# Altium PCB BOARD_2LAYER.PcbDoc (part 4 of 7)
Units mil, origin at the board's own origin, x right, y up, seen from the top; angles counter-clockwise.
Board outline 7677.17 x 7677.17 mil, 2 copper layers (Top Layer, Bottom Layer), stack 34.252 mil thick; 625 components, 375 nets, 1924 pads, 450 vias.
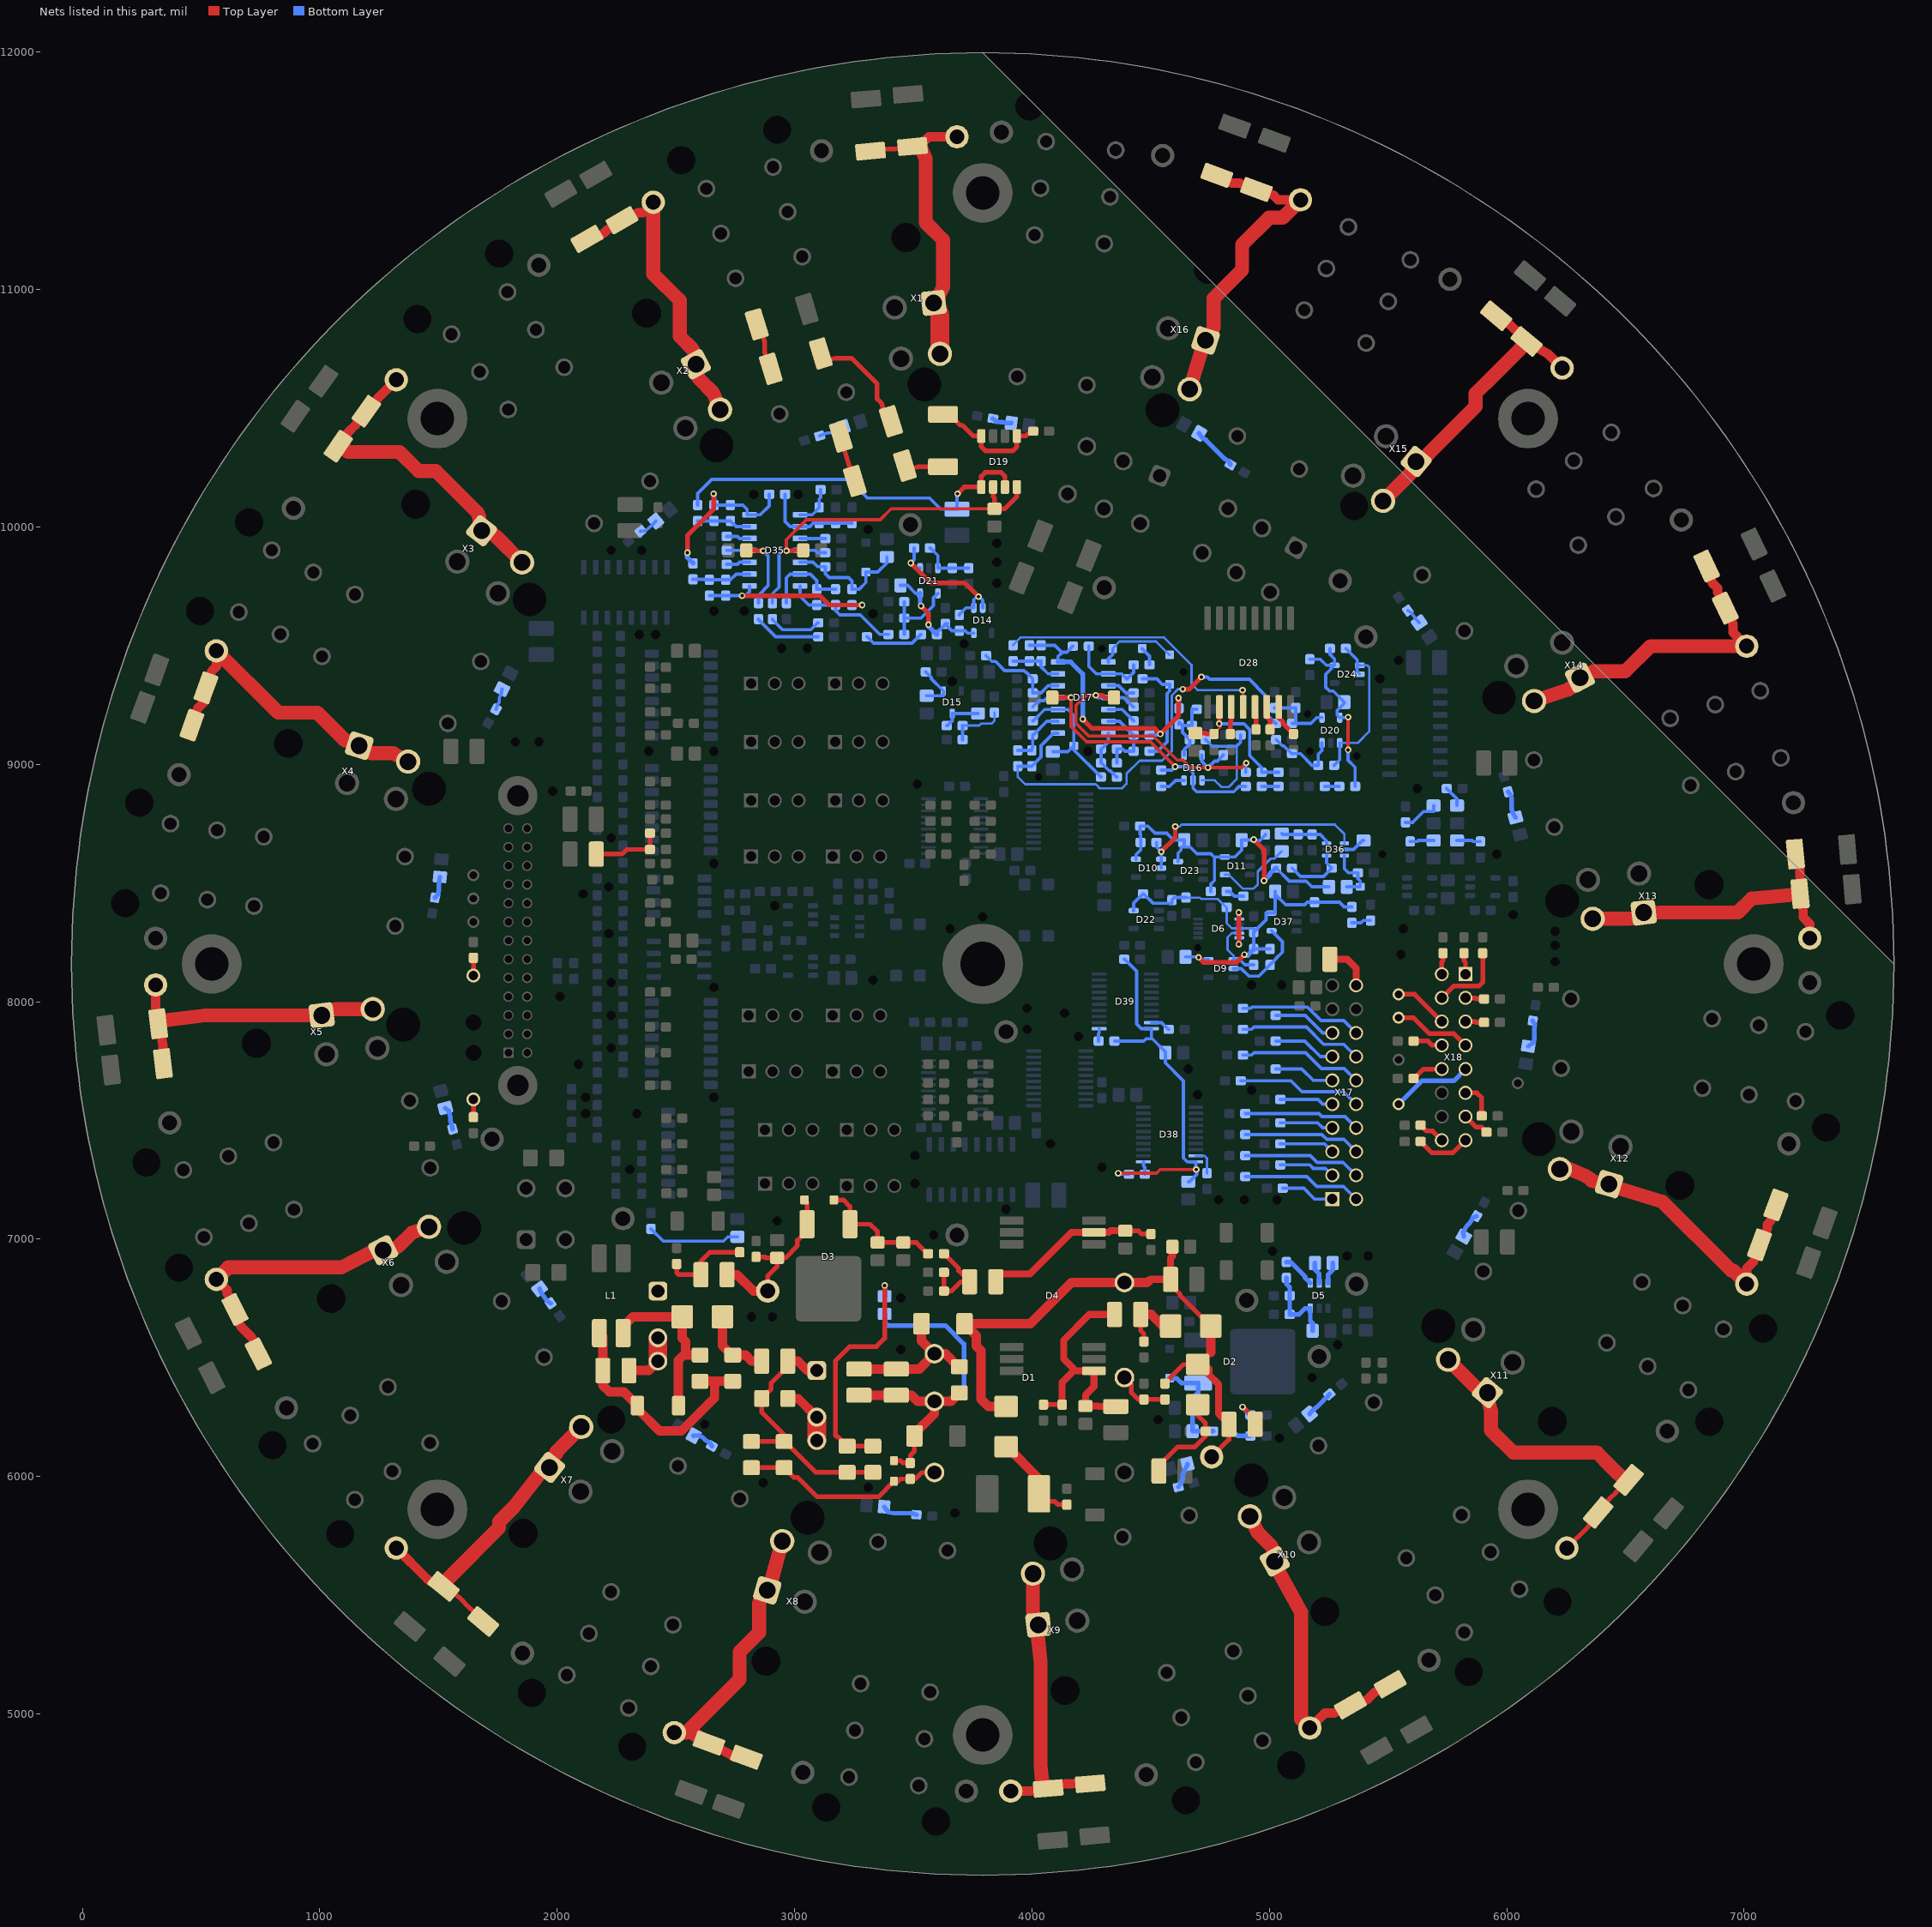
[diagram p4: the nets of this part, all layers, seen from the top]

## Via types
v1: diameter 27.56/27.56 (per signal layer), hole 13.78, Top Layer to Bottom Layer, 447 vias
v2: diameter 78.74, hole 55.12, Top Layer to Bottom Layer, 2 vias
v3: diameter 35.43/35.43 (per signal layer), hole 19.68, Top Layer to Bottom Layer, 1 vias

## Nets (pads, with @x,y where several pads share a name; then routed paths per layer and width w, separated by ;. In a path a pad name is that pad's centre, name@x,y a point inside that pad or via, vN(x,y) a via of type N, cw(c..) or ccw(c..) an arc to the next point about the centre after c; other vN are vias at no path point) (continued)
$2N8271: R1.2 R2.2 TP12.1 X1.1 X1.3 | length 1334.6
  Top Layer w19.68: R2.2@3319.79,11583.1 3372.52,11589.79 3395.77,11591.82 3420.97,11591.82 3444.42,11593.87 R1.2@3496.95,11602.78
  Top Layer w39.37: R1.2@3496.95,11602.78 3552.76,11630.7 3565.77,11643.7 TP12.1@3684.2,11643.7
  Top Layer w59.06: R1.2@3496.95,11602.78 3530.76,11599.85 3552.4,11551.82 3552.4,11282.37 3625.09,11209.69 3625.09,11010.37 3604.56,10968.4 X1.1@3585.74,10944.31
  Top Layer w78.74: X1.1@3585.74,10944.31 3610.06,10900.73 3612.13,10883.85 X1.3@3612.13,10729.39
$2N8326: R3.2 R4.2 TP13.1 X2.1 X2.3 | length 1303.7
  Top Layer w39.37: R3.2@2125.14,11213.59 2182.5,11230.3 2197.23,11238.81 2209.78,11251.36 2224.51,11259.86 R4.2@2272.78,11292.33 2326.06,11316.11 2340.78,11324.62 2361.17,11324.62 TP13.1@2404.67,11368.11
  Top Layer w59.06: TP13.1@2404.67,11368.11 2404.67,11065.87 2516.3,10954.24 2516.3,10802.44 2569.45,10749.3 2577.44,10734.28 X2.1@2584.32,10685.59 2591.2,10636.9 2599.19,10621.89 2657.8,10563.27 X2.3@2685.98,10494.4
$2N8363: R5.2 R6.2 TP14.1 X3.1 X3.3 | length 1374.7
  Top Layer w39.37: R6.2@1077.65,10340.31 1111.74,10387.28 1121.5,10401.21 1149.22,10428.93 1158.97,10442.86 R5.2@1195.76,10487.95 1236.42,10530.33 1246.17,10544.26 TP14.1@1321.99,10620.08
  Top Layer w59.06: R6.2@1077.65,10340.31 1094.15,10340.31 1106.5,10327.97 1118.34,10316.12 1335.49,10316.12 1416.06,10235.55 1489.09,10235.55 1664.16,10060.48 1670.61,10043.7 X3.1@1681.28,9984.17 1729.29,9970.55 1742.69,9960.08 X3.3@1851.91,9850.86
$2N8400: R7.2 R8.2 TP15.1 X4.1 X4.3 | length 1331
  Top Layer w39.37: R8.2@461.01,9165.05 479.74,9219.99 485.56,9235.97 520.07,9270.48 R7.2@520.07,9322.53 538.8,9377.47 544.62,9393.45 564.12,9412.95 TP15.1@564.12,9478.35
  Top Layer w59.06: TP15.1@564.12,9478.35 824.79,9217.67 989.31,9217.67 1106.46,9100.52 1122.64,9095.27 X4.1@1165.83,9078.62 1205.17,9050.12 1215.9,9046.64 1310.17,9046.64 X4.3@1371.77,9011.71
$2N8437: R9.2 R10.2 TP16.1 X5.1 X5.3 | length 1249.1
  Top Layer w39.37: TP16.1@308.21,8070.87 308.21,7981.39 310.28,7964.51 R9.2@319.2,7907.14 329.1,7874.67 338.89,7816.52 340.63,7773.7 R10.2@338.89,7739.81
  Top Layer w59.06: R9.2@319.2,7907.14 348.06,7922.14 517.01,7942.88 943.9,7942.88 960.78,7944.95 X5.1@1007.6,7942.88 1051.19,7967.2 1068.07,7969.27 X5.3@1222.53,7969.27
$2N8474: R11.2 R12.2 TP17.1 X6.1 X6.3 | length 1332.8
  Top Layer w39.37: TP17.1@564.12,6830.71 610.04,6784.79 610.04,6771.19 617.76,6756.04 R11.2@642.65,6703.59 659.69,6647.14 667.41,6631.98 712.93,6586.46 720.65,6571.31 R12.2@741.08,6516.58
  Top Layer w59.06: TP17.1@564.12,6830.71 614.4,6880.99 1091.2,6880.99 1218.76,6945.98 X6.1@1266.73,6953.65 1314.7,6961.31 1329.85,6969.03 1389.12,7028.29 X6.3@1459.66,7051.95
$2N8511: R13.2 R14.2 TP18.1 X7.1 X7.3 | length 1386.6
  Top Layer w19.68: R13.2@1520.8,5537.2 1569.91,5505.45 1584.37,5493.32 1634.4,5443.29 1647.93,5431.94 R14.2@1688.13,5389.56
  Top Layer w39.37: TP18.1@1321.99,5698.82 1450.57,5570.24 1463.6,5559.31 R13.2@1520.8,5537.2
  Top Layer w59.06: R13.2@1520.8,5537.2 1536.46,5563.85 1547.39,5576.87 1755.12,5784.61 1755.12,5809.41 1818.47,5872.75 1926.97,6011.62 X7.1@1967.74,6038.42 1985.33,6083.34 1995.8,6096.74 1995.8,6103.79 X7.3@2101.06,6209.05
$2N8548: R15.2 R16.2 TP19.1 X8.1 X8.3 | length 1282.6
  Top Layer w39.37: R16.2@2639.22,4877.21 2691.06,4849.95 2721.17,4834.01 2719.36,4834.46 2744.65,4818.16 R15.2@2796.7,4818.16
  Top Layer w59.06: TP19.1@2493.25,4921.26 2543.99,4921.26 2553.1,4930.37 ; R16.2@2639.22,4877.21 2609.82,4894.15 2553.1,4930.37 ; X8.3@2947.81,5728.1 2907.35,5580.16 2902.37,5563.9 X8.1@2884.5,5521.03 2854.94,5481.73 2849.97,5465.47 2849.97,5342.54 2768.44,5261.02 2768.44,5145.71 2553.1,4930.37
$2N8585: R17.2 R18.2 TP20.1 X9.1 X9.3 | length 1259.1
  Top Layer w39.37: TP20.1@3910.57,4675.2 3992.31,4675.2 4010.89,4676.82 R18.2@4068.29,4686.59 4124.95,4704.79 4141.89,4706.27 4169.47,4706.27 4187.07,4707.81 R17.2@4245.45,4706.27
  Top Layer w59.06: X9.3@4004.04,5591.16 4004.04,5437.01 4005.82,5420.09 X9.1@4026.67,5375.81 4024.9,5329.15 4036.4,5219.75 4036.4,4782.8 4042.33,4714.91 R18.2@4068.29,4686.59
$2N8594: R19.2 R20.2 TP21.1 X10.1 X10.3 | length 1365.1
  Top Layer w39.37: TP21.1@5170.42,4940.94 5233.6,5004.12 5273.67,5004.12 5288.4,5012.63 R20.2@5341.68,5036.41 5399.04,5053.13 5413.76,5061.63 5442.4,5090.27 5457.13,5098.77 R19.2@5509,5124.99
  Top Layer w59.06: X10.3@4917.66,5832.17 4950.13,5765.22 5008.25,5707.1 5016.5,5692.22 X10.1@5022.64,5642.78 5039.22,5599.12 5133.71,5428.65 5133.71,4977.65 TP21.1@5170.42,4940.94
$2N8603: R21.2 R22.2 TP22.1 X11.1 X11.3 | length 1434
  Top Layer w19.68: TP22.1@6253.09,5698.82 6340.21,5785.94 6352.26,5800.29 R21.2@6385.18,5848.42 6419.08,5889.3 6433.99,5907.07 6459.41,5932.49 6473.92,5949.78 R22.2@6513.14,5986.21
  Top Layer w59.06: X11.3@5752.84,6492.48 5861.66,6383.66 5874.69,6372.73 X11.1@5918.71,6353.29 5921.38,6322.84 5934.09,6276.8 5934.09,6194.09 6027.37,6100.8 6379.82,6100.8 6437.89,6042.73 6467.74,6012.88 6503.02,5983.28 R22.2@6513.14,5986.21
$2N8612: R23.2 R24.2 TP23.1 X12.1 X12.3 | length 1336.1
  Top Layer w39.37: TP23.1@7010.97,6811.02 7010.97,6876.42 7040.31,6905.76 7046.13,6921.74 R23.2@7064.86,6976.68 7092.12,7028.51 7097.93,7044.5 7097.93,7061.81 7109.21,7073.08 7115.03,7089.06 R24.2@7133.76,7144
  Top Layer w59.06: X12.3@6223.81,7295.11 6229.89,7309.62 6330.9,7267.26 6353.33,7252.99 6358.43,7245.85 6364.55,7243.81 X12.1@6430.88,7231.8 6473.75,7213.93 6655.54,7158.35 6947.06,6866.83 6955.16,6866.83 TP23.1@7010.97,6811.02
$2N8621: R25.2 R26.2 TP24.1 X13.1 X13.3 | length 1277.5
  Top Layer w39.37: R25.2@7216.11,8622.28 7234.31,8565.62 7235.8,8548.68 7235.8,8530.94 7237.34,8513.35 R26.2@7235.8,8454.96 7247.01,8397.69 7248.65,8378.98 7248.65,8355.82 7276.72,8327.76 TP24.1@7276.72,8267.72
  Top Layer w59.06: X13.3@6362.4,8349.63 6516.86,8349.63 6533.74,8351.7 X13.1@6577.32,8376.02 6599.76,8370.66 6643.39,8376.02 6973.31,8376.02 7032.47,8435.18 7234.19,8452.83 R26.2@7235.8,8454.96
$2N8630: R27.2 R28.2 TP25.1 X14.1 X14.3 | length 1364.4
  Top Layer w39.37: R28.2@6842.16,9835.3 6859.54,9779.38 6866.73,9763.96 6888.11,9742.58 6888.11,9725.64 6895.3,9710.23 R27.2@6920.9,9658.14 6946.5,9606.04 6953.69,9590.63 6953.69,9555.31 TP25.1@7010.97,9498.03
  Top Layer w59.06: X14.3@6115.42,9266.95 6257.8,9314.69 6261.35,9318.24 6276.5,9325.96 X14.1@6308.36,9365.25 6350.67,9384.02 6365.82,9391.74 6499.44,9391.74 6605.72,9498.03 TP25.1@7010.97,9498.03
$2N8639: R29.2 R30.2 TP26.1 X15.1 X15.3 | length 1285.2
  Top Layer w39.37: R29.2@5955.86,10889.96 6004.97,10858.21 6019.43,10846.08 6030.08,10835.42 6043.61,10824.07 R30.2@6077.53,10788.31 ; R30.2@6083.81,10781.7 6113.19,10764.7 6173.56,10729.14 TP26.1@6233.41,10669.29
  Top Layer w59.06: X15.3@5479.12,10109.98 5531.73,10162.6 5587.94,10218.8 5598.87,10231.83 X15.1@5618.3,10275.86 5646.92,10280.06 5673.86,10312.17 5869.19,10507.51 5869.19,10562.35 5946.23,10639.39 6050.14,10743.3 6079.19,10777.92 R30.2@6083.81,10781.7 6083.81,10782.04 R30.2@6077.53,10788.31
$2N8648: R31.2 R32.2 TP27.1 X16.1 X16.3 | length 1380.9
  Top Layer w39.37: R32.2@4778.38,11481.06 4830.22,11453.8 4846.2,11447.98 4875.31,11447.98 4891.29,11442.17 R31.2@4945.71,11422 5000.64,11403.27 5016.63,11397.45 5036.13,11377.95 TP27.1@5131.05,11377.95
  Top Layer w59.06: X16.3@4664.41,10580.14 4709,10726.85 4714.26,10743.03 X16.1@4731.32,10786.08 4759.82,10825.42 4765.08,10841.6 4765.08,10962.85 4885.05,11082.81 4885.05,11188.97 4998.71,11302.64 5055.73,11302.64 TP27.1@5131.05,11377.95
$2N9630: H5.1 R126.1 | length 109.8
  Bottom Layer w13.78: R126.1@3105.88,10384.08 3121.28,10390.72 3137.5,10395.84 3138.07,10396.4 3157.7,10396.4 3188.9,10406.24 H5.1@3205.61,10421.82
$2N9632: H6.1 R127.1 | length 80.3
  Bottom Layer w13.78: R127.1@2351.56,9982.14 2371.68,9984.14 2388.35,9998.13 2401.73,10009.36 H6.1@2415.39,10025.17
$2N9635: H8.1 R129.1 | length 92.6
  Bottom Layer w19.68: R129.1@1485.28,8438.47 1498.1,8453.16 1501.06,8469.91 1501.06,8487.5 1502.61,8505.3 H8.1@1505.74,8525.73
$2N9637: H9.1 R130.1 | length 97.7
  Bottom Layer w19.68: H9.1@1528.52,7552.46 1542.8,7540.02 1550.56,7511.04 1550.56,7498.23 1556.81,7474.92 R130.1@1559.39,7463.43
$2N9639: H10.1 R131.1 | length 78.5
  Bottom Layer w19.68: H10.1@1925.21,6791 1933.89,6771.71 1944.13,6758.13 1956.89,6739.9 R131.1@1972.09,6730.17
$2N9641: H11.1 R132.1 | length 93.8
  Bottom Layer w19.68: H11.1@2574.85,6172.24 2599.09,6172.95 2613.82,6164.45 2624.46,6153.8 2640.88,6144.32 R132.1@2651.28,6128.94
$2N9643: H12.1 R133.1 | length 148.4
  Bottom Layer w19.68: H12.1@3376.97,5872.72 3395.63,5849.36 3415.2,5845.64 3479.64,5845.64 3496.71,5844.14 R133.1@3513.06,5839.53
$2N9645: H13.1 R134.1 | length 106.3
  Bottom Layer w19.68: R134.1@4616.44,5955.91 4627.74,5973.62 4634.44,5989.58 4634.44,6007.12 4642.8,6024.75 H13.1@4655.36,6052.99
$2N9647: H14.1 R135.1 | length 117.7
  Bottom Layer w19.68: H14.1@5169.54,6264.2 5179.93,6276.25 5197.13,6290.68 5229.41,6322.96 5245.9,6336.8 R135.1@5253.05,6346.6
$2N9649: H15.1 R136.1 | length 109
  Bottom Layer w19.68: H15.1@5819.04,7010.74 5816.84,7030.15 5832.74,7057.69 5847.32,7072.27 5858.36,7091.39 R136.1@5872.19,7097
$2N9651: H16.1 R137.1 | length 121
  Bottom Layer w19.68: H16.1@6090.98,7812.63 6114.24,7830.19 6116.6,7847.03 6116.6,7885.48 6118.22,7901.31 R137.1@6109.49,7919.8
$2N9653: H17.1 R138.1 | length 116.7
  Bottom Layer w19.68: R138.1@6005.85,8885 6016.83,8870.66 6021.23,8854.23 6021.23,8811.1 6025.64,8794.67 H17.1@6036.72,8776.28
$2N9655: H18.1 R139.1 | length 70.5
  Bottom Layer w13.78: R139.1@5583.31,9647.78 5599.11,9638.47 5619.57,9609.25 H18.1@5631.25,9597.57
$2N9657: H19.1 R140.1 | length 188.7
  Bottom Layer w19.68: H19.1@4704.36,10394.68 4717.26,10375.77 4731.99,10367.26 4811.59,10287.66 4826.45,10279.08 R140.1@4836.32,10262.8
$2N9659: H20.1 R141.1 | length 82.8
  Bottom Layer w19.68: R141.1@3835.26,10456.79 3849.95,10443.97 3866.7,10441.01 3873.9,10441.01 3892.18,10438.77 H20.1@3912.82,10437.63
$2N9662: H7.1 R128.1 | length 90.8
  Bottom Layer w13.78: R128.1@1742.27,9231.74 1747.49,9248 1756,9262.72 1756,9280.68 1763.85,9295.77 H7.1@1767.32,9317.22
$3N6860: C67.2 L1.4 V1.2 V12.1 | length 754.9
  Top Layer w39.37: L1.4@2277.5,6604.33 2277.5,6631.89 2318.84,6673.23 V1.2@2526.72,6673.23 2526.72,6582.68 2540.5,6568.9 2540.5,6519.51 ; V12.1@2510.97,6299.21 2510.97,6346.46 2510.52,6346.91 2510.52,6489.53 2540.5,6519.51 ; C67.2@2601.52,6511.81 2540.5,6511.81 2540.5,6519.51
$3N6863: C68.2 L2.1 V1.1 | length 314.3
  Top Layer w39.37: V1.1@2696.01,6673.23 2696.01,6551.18 2735.38,6511.81 C68.2@2739.31,6511.81 2793.45,6511.81 2819.04,6486.22 L2.1@2861.36,6486.22
$3N6864: D1.4 R203.1 R257.2 | length 229.3
  Top Layer w19.68: D1.4@4389.31,6417.32 4417.94,6388.7 4417.94,6354.31 4447.45,6324.8 R257.2@4471.6,6324.8 R203.1@4560.18,6324.8
$3N6865: H1.1 R37.1 R40.1 | length 1005.3
  Top Layer w19.68: R40.1@3329.87,6127.95 R37.1@3221.6,6127.95 3181.27,6168.28 3177.34,6168.28 3172.17,6173.45 3172.17,6488.08 3231.87,6547.78 3344.71,6547.78 3379.08,6582.15 v1(3379.08,6805.12)
  Bottom Layer w19.68: H1.1@3379.08,6759.84 v1(3379.08,6805.12)
$3N6866: D1.6 R38.1 R39.1 R202.2 V5.1 | length 864.7
  Top Layer w19.68: R39.1@2818.05,6037.4 R38.1@2955.85,6037.4 2996.18,5997.08 3012.25,5997.08 3094.7,5914.63 3352.76,5914.63 V5.1@3418.45,5980.31 3436.16,5980.31 3446.01,5990.16 R202.2@3487.35,5990.16 3509.54,5990.16 3536.7,6017.32 D1.6@3589.31,6017.32
$3N6867: C9.2 L8.1 V2.1 | length 412.9
  Top Layer w19.68: L8.1@4029.67,5927.17 4029.67,5895.67 4095.12,5895.67 4108.9,5881.89 C9.2@4146.79,5881.89
  Top Layer w39.37: V2.1@3890.89,6125.98 3894.83,6125.98 4029.67,5991.14 L8.1@4029.67,5927.17
$3N6868: C51.2 C75.1 D2.1 FB2.2 V6.1 | length 427.8
  Bottom Layer w19.68: V6.1@4579.87,6414.37 4609.39,6414.37 4630.06,6393.7 D2.1@4699.94,6393.7 4699.94,6352.68 4676.32,6329.06 C51.2@4676.32,6289.37 C75.1@4676.32,6190.94 FB2.2@4762.94,6190.94
$3N6869: C53.2 C76.1 D3.1 FB3.2 V7.1 | length 560.8
  Top Layer w19.68: V7.1@3165.5,7165.35 3205.85,7165.35 3233.41,7137.8 D3.1@3233.41,7062.99 3318.07,7062.99 3349.55,7031.52 C76.1@3349.55,6986.22 C53.2@3457.82,6986.22 3512.94,6986.22 3560.18,6938.98 FB3.2@3562.15,6938.98
$3N6870: C14.2 C54.2 C98.2 D4.1 L3.2 R86.2 | length 1022.7
  Top Layer w19.68: R86.2@4048.37,6303.15 C14.2@4127.11,6303.15
  Top Layer w29.53: C14.2@4127.11,6303.15 4127.11,6397.05 4175.33,6445.28 ; L3.2@4347.58,6683.07 4242.69,6683.07 4134.07,6574.44 4134.07,6495.72 4175.33,6454.45 4175.33,6445.28 ; C98.2@4353.49,6295.28 4279.67,6295.28 4277.7,6297.24 C54.2@4225.53,6297.24 4225.53,6343.5 4260.97,6378.94 D4.1@4260.97,6445.28 4175.33,6445.28
$3N6871: C12.2 FB3.1 L5.2 R87.2 | length 366.3
  Top Layer w19.68: C12.2@3629.08,6860.24 R87.2@3629.08,6781.5 3661.5,6781.5 3700.87,6820.87 L5.2@3737.35,6820.87 3691.11,6867.1 3691.11,6876.94 FB3.1@3629.08,6938.98
$3N6872: C13.2 C55.2 D4.13 L5.1 | length 767.6
  Top Layer w19.68: C55.2@4392.86,7035.43 4447.82,7035.43 4461.6,7021.65 C13.2@4501.13,7021.65
  Top Layer w29.53: L5.1@3847.58,6820.87 3847.58,6854.11 3991.59,6854.11 4166.22,7028.74 D4.13@4260.97,7028.74 4323.57,7028.74 4330.26,7035.43 C55.2@4392.86,7035.43
$3N6873: D5.4 R84.1 | length 140.3
  Bottom Layer w19.68: R84.1@5071.99,6903.54 5089.37,6903.54 5149.93,6842.98 5149.93,6837.42 D5.4@5172.39,6814.96
$3N6874: C104.2 D5.5 | length 92
  Bottom Layer w19.68: C104.2@5192.07,6899.61 5192.07,6872.05 5209.79,6854.33 D5.5@5209.79,6814.96
$3N6875: C104.1 D5.6 | length 92.8
  Bottom Layer w19.68: D5.6@5247.19,6814.96 5247.19,6850.39 5266.87,6870.08 C104.1@5266.87,6899.61
$3N6877: C18.2 L3.1 V3.1 | length 266.2
  Top Layer w19.68: L3.1@4457.82,6683.07 4457.82,6615.16 4471.6,6601.38 C18.2@4471.6,6568.9
  Top Layer w39.37: L3.1@4457.82,6683.07 4501.91,6683.07 4551.12,6633.86 V3.1@4583.8,6633.86
$3N6880: C25.2 FB6.2 R107.2 | length 303.4
  Top Layer w19.68: R107.2@2164.51,8622.05 2272.78,8622.05 2292.46,8641.73 FB6.2@2390.89,8641.73 C25.2@2390.89,8710.63
$3N6882: C27.2 FB5.1 R104.1 | length 378.9
  Top Layer w19.68: FB5.1@2503.09,6895.67 2503.09,6858.27 2510.97,6850.39 R104.1@2605.46,6850.39 2605.46,6907.41 2642.93,6944.88 C27.2@2768.84,6944.88
$3N6884: C15.2 C52.2 D3.3 R104.2 TP7.1 V7.2 | length 767.2
  Top Layer w19.68: C15.2@2837.74,6925.2 2875.14,6925.2 2879.08,6921.26 C52.2@2926.32,6921.26 ; TP7.1@2886.95,6781.5 2886.95,6845.47 2926.32,6884.84 C52.2@2926.32,6921.26 ; V7.2@3041.48,7165.35 3052.31,7154.53 D3.3@3052.31,7062.99 3052.31,7035.43 3011.98,6995.11 3011.98,6972.25 2960.99,6921.26 C52.2@2926.32,6921.26
  Top Layer w39.37: R104.2@2715.69,6850.39 2758.01,6850.39 2826.91,6781.5 TP7.1@2886.95,6781.5
$3N6886: D6.9 D9.1 R90.1 | length 255.1
  Bottom Layer w9.84: D9.1@4849.55,8177.17 4849.55,8193.77 4824.03,8219.29 4824.03,8271.53 4841.87,8289.37 D6.9@4873.17,8289.37
  Bottom Layer w13.78: D9.1@4849.55,8177.17 4875.16,8177.17 4896.81,8155.51 R90.1@4934.2,8155.51
$3N6887: D6.6 D6.10 | length 190.6
  Top Layer w19.68: v1(4871.2,8242.13) v1(4871.2,8375.98)
  Bottom Layer w9.84: v1(4871.2,8242.13) 4873.17,8244.09 D6.10@4873.17,8269.69 ; v1(4871.2,8375.98) 4873.17,8374.02 D6.6@4873.17,8348.43
$3N6890: C83.1 D15.1 R243.2 | length 202.2
  Bottom Layer w13.78: R243.2@3552.31,9389.76 3575.37,9366.7 3575.37,9360.79 D15.1@3627.11,9309.06 3627.11,9289.37 C83.1@3556.24,9289.37
$3N6891: C58.2 D15.3 R244.1 | length 171
  Bottom Layer w13.78: R244.1@3640.89,9163.39 3643.84,9163.39 3664.51,9184.06 D15.3@3664.51,9214.57 C58.2@3772.78,9214.57
$3N6892: C28.2 FB10.1 R244.2 | length 236
  Bottom Layer w9.84: R244.2@3707.82,9163.39 3777.95,9163.39 3786.47,9171.91 3829.63,9171.91 3841.68,9183.96 C28.2@3841.68,9218.5
  Bottom Layer w13.78: FB10.1@3707.82,9104.33 R244.2@3707.82,9163.39
$3N6921: R171.2 X18.2 | length 90.3
  Top Layer w19.68: X18.2@5726.32,8116.54 5726.32,8167.13 5731.44,8172.24 R171.2@5731.44,8204.72
$3N6924: R172.2 X18.4 | length 322
  Top Layer w19.68: X18.4@5726.32,8016.54 5776.16,8066.37 5882.7,8066.37 5898.76,8082.44 R172.2@5898.76,8204.72
$3N6929: C16.2 C77.1 D5.3 FB4.2 R84.2 | length 355
  Bottom Layer w19.68: R84.2@5071.99,6836.61 5071.99,6811.33 5084.11,6799.21 5084.11,6798.9 5085.77,6797.24 FB4.2@5085.77,6761.81 C16.2@5085.77,6683.07 5125.14,6683.07 5150.73,6708.66 D5.3@5172.39,6708.66 5172.39,6656.48 5182.23,6646.64 C77.1@5182.23,6614.17
$3N6930: C49.2 C64.1 C99.2 D1.3 L4.1 R203.2 TP6.1 V2.2 V3.2 V4.2 | length 2669.8
  Top Layer w9.84: V4.2@4697.98,6472.44 4748.6,6523.07 4752.54,6523.07 4753.09,6523.62
  Top Layer w19.68: R203.2@4560.18,6391.73 4560.18,6393.7 4585.21,6418.74 4585.21,6419.72 4637.94,6472.44 V4.2@4697.98,6472.44 ; C99.2@4583.8,6830.71 4583.8,6809.06 4624.13,6768.73 4624.13,6762.82 V3.2@4753.09,6633.86 ; TP6.1@4757.03,6082.68 4829.87,6155.51 L4.1@4829.87,6220.47
  Top Layer w29.53: 4490.99,6823.52 4498.17,6830.71 C99.2@4583.8,6830.71 4583.8,6920.28 4591.68,6928.15 C49.2@4591.68,6968.5 ; V4.2@4697.98,6472.44 4726.94,6472.44 4745.37,6454.02 4745.37,6428.99 4785.73,6388.63 4785.73,6286.26 4786.06,6285.93 4786.06,6264.28 L4.1@4829.87,6220.47
  Top Layer w39.37: V2.2@3890.89,6295.28 3816.09,6295.28 3785.57,6325.79 3785.57,6530.79 3765.93,6550.44 3765.93,6593.46 C64.1@3715.69,6643.7 3992.67,6643.7 4166.76,6817.79 4321.92,6817.79 4322.39,6817.32 D1.3@4389.31,6817.32 4484.79,6817.32 4490.99,6823.52 ; 4753.09,6523.62 V3.2@4753.09,6633.86
$3N6934: H3.1 R143.1 | length 162.8
  Bottom Layer w13.78: R143.1@5573.96,8755.91 5604.47,8755.91 5604.47,8756.58 5649.2,8801.31 5692.07,8801.31 H3.1@5692.07,8826.77
$3N6936: H4.1 R144.1 | length 393.1
  Bottom Layer w13.78: R144.1@2394.83,7043.31 2446.5,6991.64 2700.44,6991.64 2718.64,7009.84 H4.1@2759,7009.84
$3N6939: H2.2 R142.1 | length 88.8
  Bottom Layer w13.78: R142.1@5747.19,8897.64 5790.5,8854.33 H2.2@5790.5,8826.77
$3N6941: C141.2 D36.5 | length 96.2
  Bottom Layer w13.78: D36.5@5316.09,8641.73 5355.46,8641.73 5392.86,8679.13 C141.2@5396.79,8679.13
$3N6942: C31.2 D36.6 R258.1 V17.1 | length 240.4
  Bottom Layer w13.78: D36.6@5316.09,8616.14 5316.09,8597.44 5315.83,8597.18 5315.83,8560.58 5333.11,8543.31 C31.2@5373.17,8543.31 5373.17,8518.81 5383.01,8508.96 V17.1@5383.01,8484.25 R258.1@5325.93,8484.25
$3N6943: D36.1 R92.1 R185.1 | length 258.4
  Bottom Layer w13.78: R92.1@5095.61,8562.99 5130.54,8528.06 5228.01,8528.07 R185.1@5262.94,8562.99 5241.28,8584.65 D36.1@5241.28,8616.14
$3N6944: D10.1 D10.2 D36.4 R93.1 | length 1019.1
  Top Layer w19.68: v1(4544.43,8631.89) 4603.49,8690.94 v1(4603.49,8738.19)
  Bottom Layer w9.84: v1(4603.49,8738.19) 4622.03,8738.19 4630.54,8746.7 4666.03,8746.7 5275.88,8746.7 5316.09,8706.5 D36.4@5316.09,8667.32
  Bottom Layer w13.78: R93.1@4524.75,8671.26 4524.75,8651.57 v1(4544.43,8631.89) D10.1@4544.43,8600.39 D10.2@4544.43,8562.99
$3N6945: C135.2 D36.3 R145.2 R259.2 | length 211.8
  Bottom Layer w13.78: R259.2@5052.31,8708.66 5056.24,8704.72 C135.2@5121.2,8704.72 R145.2@5180.26,8704.72 5213.57,8704.72 5241.28,8677.01 D36.3@5241.28,8667.32
$3N6946: D9.2 D37.4 R89.1 | length 370.6
  Bottom Layer w13.78: D9.2@4849.55,8139.76 4882.03,8139.76 4914.06,8107.74 4955.14,8107.74 4974.52,8127.12 4974.7,8127.12 R89.1@5003.09,8155.51 5028.13,8180.55 5028.13,8182.51 5054.59,8208.97 5054.59,8253.71 5031.12,8277.17 5031.04,8277.17 D37.4@5009,8299.21
$3N6951: D11.4 R259.1 | length 361.9
  Bottom Layer w9.84: D11.4@4812.15,8535.43 4829.11,8535.43 4888.42,8476.12 4932.85,8476.12 4951.08,8494.34 4951.08,8548.61 5005.38,8602.92 5021.37,8602.92 R259.1@5052.31,8633.86
$3N6960: H21.2 R146.1 | length 100.1
  Bottom Layer w13.78: H21.2@5790.5,8679.13 5854.47,8679.13 5858.41,8675.2 R146.1@5888.92,8675.2
$3N6962: H22.2 R147.1 | length 100.1
  Bottom Layer w13.78: R147.1@5593.64,8675.2 5624.16,8675.2 5628.09,8679.13 H22.2@5692.07,8679.13
$3N6966: C34.2 L6.1 V4.1 | length 416.9
  Top Layer w19.68: L6.1@4534.59,6023.62 4534.59,6045.28 4614.7,6125.38 4686.28,6125.38 4731.44,6170.54 C34.2@4731.44,6190.94 4731.44,6224.53 4697.98,6258 V4.1@4697.98,6303.15
$3N6975: FB11.2 R245.2 | length 79
  Bottom Layer w13.78: R245.2@4820.02,8464.57 4832.69,8464.57 4852.38,8444.88 FB11.2@4890.89,8444.88
$3N6976: C30.2 C59.2 C85.1 D10.5 D11.5 D23.5 R92.2 R93.2 R101.2 R245.1 R258.2 | length 1570.4
  Top Layer w19.68: v1(4934.2,8683.07) 4977.5,8639.76 v1(4977.5,8509.84)
  Bottom Layer w13.78: D10.5@4438.13,8600.39 4438.13,8620.17 4457.82,8639.85 R93.2@4457.82,8671.26 4457.82,8704.72 4455.85,8706.69 C30.2@4455.85,8740.16 4488.33,8740.16 4518.29,8710.2 4566.88,8710.2 4595.98,8681.1 C85.1@4640.89,8681.1 C85.1@4640.89,8651.78 ; D23.5@4615.3,8590.55 4615.3,8626.19 4627.89,8638.78 4627.89,8651.78 C85.1@4640.89,8651.78 ; R245.1@4753.09,8464.57 4753.09,8495.08 4768.67,8510.65 4768.67,8610.24 ; R101.2@4983.41,8704.72 4983.41,8702.76 4958.37,8677.72 4937.58,8677.72 4934.2,8681.1 C59.2@4883.01,8681.1 4883.01,8638.78 4854.47,8610.24 D11.5@4812.15,8610.24 4768.67,8610.24 ; R92.2@5028.68,8562.99 5083.69,8507.98 5155.14,8507.98 5178.87,8484.25 R258.2@5251.13,8484.25 ; C85.1@4640.89,8651.78 4666.27,8651.78 4694.76,8623.29 4753.91,8623.29 4766.97,8610.24 4768.67,8610.24
  Bottom Layer w19.68: v1@4934.2,8681.1 v1(4934.2,8683.07) ; v1(4977.5,8509.84) 5001.68,8534.02 5001.68,8537.96 5026.72,8562.99 R92.2@5028.68,8562.99
$3N6977: FB12.2 R246.2 | length 82.8
  Bottom Layer w13.78: R246.2@5347.58,8332.68 5385.97,8332.68 5395.81,8342.52 FB12.2@5426.32,8342.52
$3N6978: C29.2 C32.2 C60.2 C84.1 D6.8 D9.5 D22.5 D37.5 R89.2 R90.2 R91.2 R94.2 R95.2 R100.2 R246.1 | length 1791.1
  Top Layer w19.68: v1(4701.91,8187.01) 4722.46,8166.46 4862.44,8166.46 4877.4,8181.42 ; 4877.43,8181.42 v1(4894.83,8198.82)
  Bottom Layer w9.84: R94.2@4648.76,8438.98 4706.6,8438.98 4712.88,8432.7 4783.15,8432.7 4818.05,8397.8 R91.2@4820.02,8397.8 4820.02,8330.91 4841.87,8309.06 D6.8@4873.17,8309.06 4934.2,8309.06 C29.2@4934.2,8293.31
  Bottom Layer w13.78: D22.5@4428.29,8383.86 4428.29,8415.35 C32.2@4467.66,8454.72 4469.63,8454.72 4509,8415.35 4589.71,8415.35 R100.2@4589.71,8429.13 4599.55,8438.98 R94.2@4648.76,8438.98 ; C84.1@4646.79,8188.98 4698.96,8188.98 4700.93,8187.01 4710.77,8177.17 D9.5@4743.25,8177.17 ; R89.2@5003.09,8222.44 R90.2@4934.2,8222.44 C29.2@4934.2,8293.31 4986.87,8345.98 4986.87,8374.02 D37.5@5009,8374.02 5024.75,8374.02 C60.2@5024.75,8452.68 ; C60.2@5024.75,8464.57 C60.2@5024.75,8452.68 ; R246.1@5347.58,8399.61 5315.1,8399.61 5295.42,8419.29 R95.2@5190.1,8419.29 5159.59,8419.29 5149.09,8408.79 5068.64,8408.79 C60.2@5024.75,8452.68
  Bottom Layer w19.68: v1@4700.93,8187.01 v1(4701.91,8187.01) ; v1(4894.83,8198.82) 4898.21,8195.44 4909.16,8195.44 4934.2,8220.47 R90.2@4934.2,8222.44
$3N6983: D38.19 R187.2 | length 114.6
  Bottom Layer w9.84: D38.19@4690.1,7351.38 4726.28,7351.38 4737.35,7340.31 R187.2@4737.35,7277.56
$3N6984: D38.1 R98.2 | length 55.8
  Bottom Layer w13.78: D38.1@4469.63,7325.79 4469.63,7308.07 4473.57,7304.13 4475.53,7304.13 R98.2@4475.53,7273.62
$3N6993: D39.19 R188.2 | length 84.7
  Bottom Layer w13.78: D39.19@4503.09,7912.4 4545.42,7912.4 4573.96,7883.86 R188.2@4575.93,7883.86
$3N6994: D39.1 R99.2 | length 53
  Bottom Layer w13.78: R99.2@4280.65,7834.65 4280.65,7866.14 4282.62,7868.11 D39.1@4282.62,7886.81
$3N7053: C62.1 C63.1 D38.20 D39.20 FB7.2 R98.1 R99.1 | length 1670.8
  Top Layer w13.78: v1(4363.33,7277.56) 4524.75,7277.56 4540.5,7293.31 v1(4692.07,7293.31)
  Bottom Layer w13.78: R99.1@4347.58,7834.65 4470.61,7834.65 4480.46,7844.49 4503.09,7844.49 ; v1(4363.33,7277.56) 4367.27,7273.62 R98.1@4408.61,7273.62 ; FB7.2@4388.92,8179.13 4390.89,8179.13 4440.89,8129.13 4440.89,7906.69 4460.77,7886.81 D39.20@4503.09,7886.81 4503.09,7844.49 ; C63.1@4658.61,7242.13 4662.54,7242.13 4693.48,7273.07 4693.48,7291.89 v1(4692.07,7293.31) 4690.1,7295.28 D38.20@4690.1,7325.79 4654.51,7325.79 4638.24,7342.05 4638.24,7666.81 4562.15,7742.9 C62.1@4562.15,7785.43 4562.15,7789.37 4507.03,7844.49 4503.09,7844.49
$3N7060: C67.1 C68.1 L1.3 L7.1 V12.2 | length 1056.1
  Top Layer w39.37: L1.3@2177.5,6604.33 2192.07,6589.76 L7.1@2192.07,6446.85 2192.07,6384.18 2219.91,6356.34 2280.61,6356.34 V12.2@2337.74,6299.21 2337.74,6285.43 2430.72,6192.45 2523.36,6192.45 2662.54,6331.63 2662.54,6385.83 2678.29,6401.57 ; C67.1@2601.52,6401.57 2678.29,6401.57 ; C68.1@2739.31,6401.57 2678.29,6401.57
$3N7061: C65.2 C69.1 C70.1 C71.1 C142.2 C143.2 D1.2 H1.2 L7.2 R36.1 R202.1 V5.2 | length 2058.9
  Top Layer w9.84: R36.1@2971.6,6328.74 R36.1@2974.41,6328.74
  Top Layer w19.68: V5.2@3418.45,6066.93 3446.01,6066.93 3455.85,6057.09 R202.1@3487.35,6057.09 3487.35,6089.57 3505.06,6107.28 C65.2@3505.06,6171.26
  Top Layer w39.37: L7.2@2302.31,6446.85 2384.98,6446.85 C143.2@2424.35,6486.22 ; R36.1@2974.41,6328.74 3014.9,6328.74 v2(3093.64,6250) ; C71.1@3270.81,6342.52 C70.1@3428.29,6342.52 3492.19,6342.52 3517.38,6317.32 D1.2@3589.31,6317.32 ; C65.2@3505.06,6171.26 3505.06,6182.09 3544.86,6221.88 3546.04,6221.88 3589.31,6265.16 D1.2@3589.31,6317.32 ; C69.1@3694.04,6352.36 3659,6317.32 D1.2@3589.31,6317.32
  Top Layer w78.74: C143.2@2424.35,6486.22 v2(2424.35,6584.65) ; C142.2@3093.64,6151.57 v2(3093.64,6250)
  Bottom Layer w19.68: H1.2@3379.08,6685.04 3379.08,6650.57 3393,6636.65 3634.82,6636.65 3713.78,6557.68 3713.78,6364.7 3666.41,6317.32 D1.2@3589.31,6317.32
$3N7062: C64.2 C69.2 C70.2 C71.2 C142.1 C143.1 D1.1 L2.2 R36.2 R37.2 R38.2 R39.2 R40.2 | length 1749
  Top Layer w19.68: R39.2@2818.05,6147.64 R38.2@2955.85,6147.64 ; L2.2@2971.6,6486.22 2971.6,6464.57 2901.69,6394.66 2901.69,6369.07 R36.2@2861.36,6328.74 2861.36,6270.37 2955.85,6175.88 R38.2@2955.85,6147.64 ; R40.2@3329.87,6017.72 R37.2@3221.6,6017.72 3089.71,6017.72 2959.79,6147.64 R38.2@2955.85,6147.64
  Top Layer w39.37: L2.2@2971.6,6486.22 3013.92,6486.22 3053.29,6446.85 C142.1@3093.64,6446.85 ; C71.2@3270.81,6452.76 C70.2@3428.29,6452.76 3524.75,6452.76 D1.1@3589.31,6517.32 ; C64.2@3534.59,6643.7 3534.59,6572.05 D1.1@3589.31,6517.32 ; C69.2@3694.04,6462.6 3690.1,6462.6 3635.38,6517.32 D1.1@3589.31,6517.32
$3N9079: R150.2 X17.1 | length 228
  Bottom Layer w13.78: R150.2@5056.24,7214.57 5144.83,7214.57 5190.5,7168.9 X17.1@5265.3,7168.9
$3N9080: R151.2 X17.3 | length 237.2
  Bottom Layer w13.78: R151.2@5046.4,7312.99 5170.02,7312.99 5185.58,7297.43 5236.76,7297.43 X17.3@5265.3,7268.9
$3N9081: R152.2 X17.5 | length 232.4
  Bottom Layer w13.78: R152.2@5046.4,7401.57 5232.62,7401.57 X17.5@5265.3,7368.9
$3N9082: R153.2 X17.7 | length 227.7
  Bottom Layer w13.78: R153.2@5046.4,7490.16 5203.68,7490.16 5224.94,7468.9 X17.7@5265.3,7468.9
$3N9083: R154.2 X17.9 | length 227.1
  Bottom Layer w13.78: R154.2@5046.4,7588.58 5205.26,7588.58 5224.94,7568.9 X17.9@5265.3,7568.9
$3N9084: R155.2 X17.11 | length 258.3
  Bottom Layer w13.78: R155.2@5026.72,7716.54 5136.89,7716.54 5184.52,7668.9 X17.11@5265.3,7668.9
$3N9085: R156.2 X17.13 | length 265.8
  Bottom Layer w13.78: R156.2@5026.72,7834.65 5148.99,7834.65 5214.74,7768.9 X17.13@5265.3,7768.9
$3N9086: R157.2 X17.15 | length 269.2
  Bottom Layer w13.78: R157.2@5026.72,7942.91 5150.93,7942.91 5224.94,7868.9 X17.15@5265.3,7868.9
$3N9087: R158.2 X17.2 | length 505.8
  Bottom Layer w13.78: R158.2@4898.76,7263.78 5157.87,7263.78 5199.95,7221.7 5312.49,7221.7 X17.2@5365.3,7168.9
$3N9088: R159.2 X17.4 | length 501.1
  Bottom Layer w13.78: R159.2@4898.76,7352.36 5172.22,7352.36 5201.24,7323.34 5310.86,7323.34 X17.4@5365.3,7268.9
$3N9089: R160.2 X17.6 | length 496.4
  Bottom Layer w13.78: R160.2@4898.76,7440.94 5221.28,7440.94 5242.04,7420.18 5314.01,7420.18 X17.6@5365.3,7368.9
$3N9090: R161.2 X17.8 | length 491.6
  Bottom Layer w13.78: R161.2@4898.76,7529.53 4931.24,7529.53 4945.16,7529.53 5208.23,7529.53 5221.82,7515.94 5318.26,7515.94 X17.8@5365.3,7468.9
$3N9091: R162.2 X17.10 | length 527
  Bottom Layer w13.78: R162.2@4879.08,7667.32 5091.71,7667.32 5137.36,7621.67 5312.52,7621.67 X17.10@5365.3,7568.9
$3N9092: R163.2 X17.12 | length 528.7
  Bottom Layer w13.78: R163.2@4888.92,7775.59 4925.48,7775.59 4935.32,7785.43 5152.32,7785.43 5219,7718.76 5315.44,7718.76 X17.12@5365.3,7668.9
$3N9093: R164.2 X17.14 | length 532.2
  Bottom Layer w13.78: R164.2@4888.92,7883.86 4925.48,7883.86 4935.32,7893.7 5155.88,7893.7 5228.86,7820.72 5313.48,7820.72 X17.14@5365.3,7768.9
$3N9094: R165.2 X17.16 | length 523.9
  Bottom Layer w13.78: R165.2@4888.92,7972.44 4921.4,7972.44 4926.99,7978.03 5159.73,7978.03 5217.25,7920.5 5313.69,7920.5 X17.16@5365.3,7868.9
$3N9104: R106.2 X17.20 | length 198.6
  Top Layer w29.53: R106.2@5255.06,8179.13 5327.88,8179.13 5365.3,8141.72 X17.20@5365.3,8068.9
$3N9149: C10.2 FB2.1 L4.2 R88.2 | length 331.8
  Top Layer w19.68: v1(4886.95,6293.31) 4888.92,6293.31 4940.1,6242.13 L4.2@4940.1,6220.47
  Bottom Layer w19.68: FB2.1@4829.87,6190.94 4847.58,6190.94 4867.27,6171.26 R88.2@4920.42,6171.26 C10.2@4920.42,6259.84 4918.45,6259.84 4886.95,6291.34 v1(4886.95,6293.31)
$3N9198: R167.2 X18.15 | length 230.6
  Top Layer w19.68: R167.2@5636.95,7411.42 5684.2,7364.17 5773.96,7364.17 X18.15@5826.32,7416.54
$3N9199: R166.2 X18.16 | length 115.8
  Top Layer w19.68: R166.2@5636.95,7480.31 5661.99,7455.28 5687.58,7455.28 X18.16@5726.32,7416.54
$3N9201: R170.2 X18.1 | length 90.8
  Top Layer w19.68: R170.2@5820.02,8204.72 5820.02,8172.24 5826.32,8165.94 X18.1@5826.32,8116.54
$3N9228: R149.2 X18.5 | length 79.7
  Top Layer w19.68: X18.5@5826.32,7916.54 5867.86,7916.54 5871.01,7913.39 R149.2@5904.67,7913.39
$3N9229: R148.1 X18.3 | length 80.3
  Top Layer w19.68: X18.3@5826.32,8016.54 5867.07,8016.54 5871.79,8011.81 R148.1@5904.67,8011.81
$3N9241: R189.2 X18.10 | length 135.2
  Top Layer w19.68: R189.2@5607.42,7677.17 5609.39,7677.17 5648.76,7716.54 X18.10@5726.32,7716.54
$3N9243: R168.2 X18.8 | length 126.5
  Top Layer w19.68: R168.2@5607.42,7834.65 5639.9,7834.65 5640.03,7834.77 5667.74,7834.77 5685.97,7816.54 X18.8@5726.32,7816.54
$3N9245: R169.2 X18.11 | length 152.8
  Top Layer w19.68: X18.11@5826.32,7616.54 5873.43,7616.54 5894.83,7595.14 R169.2@5894.83,7519.69
$3N9255: R190.2 X18.13 | length 115.4
  Top Layer w19.68: X18.13@5826.32,7516.54 5870.97,7471.88 5893.41,7471.88 R190.2@5914.51,7450.79
$3N9275: KW6.1 X18.6 | length 229.6
  Top Layer w19.68: KW6.1@5544.43,8031.5 5611.52,8031.5 5694.31,7948.71 5694.31,7948.55 X18.6@5726.32,7916.54
$3N9277: KW4.1 X18.7 | length 330.2
  Top Layer w19.68: KW4.1@5544.43,7933.07 5606.66,7933.07 5673.23,7866.51 5776.35,7866.51 X18.7@5826.32,7816.54
$3N9279: KW5.1 X18.9 | length 343
  Bottom Layer w19.68: KW5.1@5544.43,7568.9 5642.55,7667.01 5776.8,7667.01 X18.9@5826.32,7716.54
$3N9315: KW9.1 R191.2 | length 74.8
  Top Layer w19.68: R191.2@1646.79,7513.78 KW9.1@1646.79,7588.58
$3N9319: KW10.1 R192.2 | length 74.8
  Top Layer w19.68: KW10.1@1646.79,8110.24 R192.2@1646.79,8185.04
$4N1524: C136.1 D28.13 | length 96.4
  Top Layer w19.68: D28.13@4939.51,9242.13 4939.51,9206.82 4944.04,9202.29 C136.1@4944.04,9147.64
$4N1528: D17.2 R208.1 R209.2 R210.2 | length 338.7
  Bottom Layer w13.78: R208.1@4239.31,9498.03 4239.31,9413.06 4270.88,9381.5 D17.2@4321.99,9381.5 4377.5,9381.5 R210.2@4398.76,9360.24 4400.73,9360.24 4428.29,9387.8 R209.2@4428.29,9419.29
$4N1529: D17.3 R193.1 | length 118.9
  Bottom Layer w13.78: D17.3@4321.99,9331.5 4365.5,9331.5 4395.81,9301.18 R193.1@4428.29,9301.18
$4N1530: D17.5 R194.1 | length 126.4
  Bottom Layer w13.78: D17.5@4321.99,9231.5 4379.87,9231.5 R194.1@4428.29,9183.07
$4N1531: D17.1 V8.2 V9.1 | length 339.7
  Bottom Layer w9.84: V8.2@4340.69,9488.19 4340.69,9489.17 4369.24,9517.72 4522.78,9517.72 4578.88,9461.61 V9.1@4579.87,9461.61
  Bottom Layer w13.78: D17.1@4321.99,9431.5 4321.99,9445.07 4340.69,9463.77 V8.2@4340.69,9488.19
$4N1532: R209.1 V8.1 | length 81.5
  Bottom Layer w13.78: V8.1@4464.71,9488.19 4464.71,9487.2 4495.22,9456.69 R209.1@4495.22,9419.29
$4N1533: C111.1 D17.6 R211.1 R227.1 R228.2 | length 333
  Bottom Layer w13.78: D17.6@4321.99,9181.5 4368.84,9181.5 4426.32,9124.02 R227.1@4428.29,9124.02 R211.1@4428.29,9055.12 4391.87,9055.12 4382.03,9064.96 C111.1@4357.42,9064.96 R228.2@4357.42,9005.91
$4N1534: R210.1 R211.2 V9.2 | length 461.3
  Bottom Layer w13.78: R210.1@4465.69,9360.24 4525.73,9360.24 4548.37,9337.6 V9.2@4579.87,9337.6 4579.87,9309.06 4569.27,9298.46 4569.27,9094.68 4529.71,9055.12 R211.2@4495.22,9055.12
$4N1535: C107.1 D17.13 R207.1 R232.2 | length 225.2
  Bottom Layer w13.78: R207.1@3920.42,9435.04 C107.1@3989.31,9435.04 R232.2@4038.53,9435.04 4038.53,9411.02 4068.05,9381.5 D17.13@4109.39,9381.5
$4N1536: D16.3 R195.1 | length 107.1
  Bottom Layer w13.78: R195.1@4544.43,8907.48 4579.3,8907.48 4604.89,8933.07 D16.3@4640.89,8933.07
$4N1537: C109.2 D16.1 R173.2 | length 507.9
  Bottom Layer w9.84: D16.1@4715.69,8933.07 4769.48,8933.07 4798.02,8904.53 4829.01,8904.53 4862.29,8937.8 4862.29,9076.24
  Bottom Layer w13.78: C109.2@4731.44,9104.33 4759.54,9076.24 4862.29,9076.24 4862.29,9076.71 4879.08,9093.5 R173.2@4879.08,9124.02
$4N1538: C111.2 D17.7 R219.2 R228.1 | length 231.2
  Bottom Layer w13.78: D17.7@4321.99,9131.5 4321.99,9094.49 4292.46,9064.96 C111.2@4290.5,9064.96 R228.1@4290.5,9005.91 4292.46,9005.91 4326.48,8971.88 4330.42,8971.88 4355.46,8946.85 R219.2@4357.42,8946.85
$4N1539: C105.1 D17.9 R212.2 R255.2 | length 255.8
  Bottom Layer w13.78: C105.1@3940.1,9059.06 R255.2@3999.16,9059.06 3999.16,9067.44 4003.09,9071.38 R212.2@4003.09,9124.02 4005.06,9124.02 4062.54,9181.5 D17.9@4109.39,9181.5
$4N1540: C107.2 D17.14 R208.2 R227.2 R230.2 R232.1 | length 1195.9
  Top Layer w19.68: v1(4213.72,9190.94) 4253.09,9151.57 4516.87,9151.57 v1(4540.5,9127.95) 4617.27,9204.72 v1(4617.27,9279.53)
  Bottom Layer w13.78: C107.2@3989.31,9501.97 R232.1@4038.53,9501.97 4095.67,9501.97 4124.64,9473 ; D17.14@4109.39,9431.5 4109.39,9454.13 4124.64,9469.38 4124.64,9473 ; R208.2@4172.39,9498.03 4147.35,9473 4124.64,9473 ; R227.2@4495.22,9124.02 4536.56,9124.02 v1(4540.5,9127.95)
  Bottom Layer w19.68: D17.14@4109.39,9431.5 4163.3,9431.5 4213.72,9381.07 v1(4213.72,9190.94) ; v1(4617.27,9279.53) 4619.24,9277.56 R230.2@4619.24,9236.22
$4N1541: C108.2 D17.12 R204.2 R233.2 | length 415.5
  Bottom Layer w13.78: R204.2@3806.24,9458.66 3831.28,9433.63 3846.04,9433.63 3884.9,9394.77 3966.59,9394.77 3976.09,9385.27 3978.06,9385.27 R233.2@4003.09,9360.24 C108.2@4003.09,9301.18 4037.74,9301.18 4068.05,9331.5 D17.12@4109.39,9331.5
$4N1543: C109.1 C110.1 D16.4 R226.2 R230.1 | length 307.5
  Bottom Layer w13.78: R230.1@4619.24,9169.29 4619.24,9179.13 R230.1@4634,9164.37 ; D16.4@4640.89,9039.37 4640.89,9062.01 4664.51,9085.63 C109.1@4664.51,9104.33 4634,9134.84 R230.1@4634,9164.37 ; C110.1@4694.04,9232.28 4674.35,9232.28 R226.2@4674.35,9163.39 4634.98,9163.39 R230.1@4634,9164.37
$4N1547: D35.3 R196.1 | length 106.6
  Bottom Layer w13.78: D35.3@3022.78,9951.57 3095.81,9951.57 3096.6,9950.79 R196.1@3129.08,9950.79
$4N1548: D35.10 R197.1 | length 100.2
  Bottom Layer w13.78: R197.1@2713.72,9842.52 2759.79,9842.52 2768.84,9851.57 D35.10@2810.18,9851.57
$4N1549: C113.1 D35.9 R229.2 R231.1 | length 249
  Bottom Layer w13.78: R231.1@2571.99,9779.53 2618.25,9779.53 2620.22,9777.56 C113.1@2640.89,9777.56 R229.2@2709.79,9777.56 2729.47,9777.56 2753.49,9801.57 D35.9@2810.18,9801.57
$4N1550: C112.1 D35.13 R213.1 R214.2 | length 228.5
  Bottom Layer w13.78: R213.1@2591.68,10025.59 C112.1@2660.57,10025.59 R214.2@2729.47,10025.59 2753.49,10001.57 D35.13@2810.18,10001.57
$4N1551: C113.2 D35.8 R221.2 R229.1 | length 766.2
  Top Layer w19.68: v1(2778.68,9710.63) 3106.51,9710.63 3145.88,9671.26 v1(3284.59,9671.26)
  Bottom Layer w13.78: C113.2@2640.89,9710.63 R229.1@2709.79,9710.63 v1(2778.68,9710.63) 2793.84,9710.63 2810.18,9726.97 D35.8@2810.18,9751.57
  Bottom Layer w19.68: R221.2@3241.28,9671.26 v1(3284.59,9671.26)
$4N1552: C106.1 D35.6 R216.2 R256.2 | length 367.2
  Bottom Layer w13.78: R216.2@2965.69,9679.13 2965.69,9785.83 2981.44,9801.57 D35.6@3022.78,9801.57 3066.09,9801.57 3093.49,9774.17 3093.49,9772.8 3093.64,9772.64 R256.2@3093.64,9738.19 C106.1@3172.39,9738.19
$4N1553: D35.12 R198.1 | length 100.2
  Bottom Layer w13.78: R198.1@2713.72,9960.63 2759.79,9960.63 2768.84,9951.57 D35.12@2810.18,9951.57
$4N1554: C115.2 D35.1 R174.2 | length 172
  Bottom Layer w13.78: D35.1@3022.78,10051.57 3074.35,10051.57 3103.49,10080.71 C115.2@3103.49,10082.68 3103.49,10118.11 3109.39,10124.02 R174.2@3109.39,10157.48
$4N1556: C112.2 D35.14 R214.1 R215.2 R231.2 | length 724.8
  Top Layer w19.68: v1(2548.37,9891.73) 2548.37,9964.61 2658.61,10074.84 v1(2658.61,10139.76)
  Bottom Layer w13.78: C112.2@2660.57,10092.52 R214.1@2729.47,10092.52 2781.62,10092.52 2799.93,10074.21 2799.93,10051.57 D35.14@2810.18,10051.57 2853.49,10051.57 2853.57,10051.66 2855.59,10051.66 2892.86,10088.92 R215.2@2892.86,10137.8
  Bottom Layer w19.68: v1(2548.37,9891.73) 2546.96,9890.32 2546.96,9873.46 2571.99,9848.43 R231.2@2571.99,9846.46 ; v1(2658.61,10139.76) 2660.57,10137.8 C112.2@2660.57,10092.52
$4N1557: D19.5 D19.7 R213.2 R239.2 | length 1600
  Top Layer w19.68: v1(3686.16,10139.76) 3714.51,10168.11 D19.5@3786.36,10168.11 3786.36,10213.39 3802.98,10230 3869.75,10230 3886.36,10213.39 D19.7@3886.36,10168.11
  Bottom Layer w13.78: R213.2@2591.68,10092.52 2591.68,10141.21 2651.16,10200.69 3227.42,10200.69 3306.36,10121.76 3568.34,10121.76 3615.3,10074.8 R239.2@3684.2,10074.8 3684.2,10137.8 v1(3686.16,10139.76)
$4N1558: C114.1 C115.1 D35.2 R215.1 R217.2 | length 410.9
  Bottom Layer w13.78: R215.1@2959.79,10137.8 2959.79,10023.23 2981.44,10001.57 D35.2@3022.78,10001.57 3064.12,10001.57 3078.29,10015.75 C115.1@3103.49,10015.75 R217.2@3172.39,10015.75 C114.1@3241.28,10015.75
$4N1561: R237.2 R238.1 | length 199
  Top Layer w19.68: R238.1@2840.59,10853.6 2865.65,10805.72 2873.73,10779.29 2873.73,10737.13 2878.7,10720.87 R237.2@2899.64,10666.59
$4N1562: R236.2 R237.1 | length 468.4
  Top Layer w19.68: R237.1@3110.48,10731.05 3145.59,10703.6 3171.65,10711.57 3238.86,10711.57 3347.28,10603.15 3347.28,10539.29 3367.22,10519.35 3375.6,10491.93 R236.2@3405.76,10445.62
$4N1563: R235.2 R236.1 | length 196.7
  Top Layer w19.68: R236.1@3194.92,10381.16 3194.92,10371.31 3210.94,10320.68 3228.06,10264.69 3233.03,10248.43 R235.2@3253.97,10194.15
$4N1564: R234.2 R235.1 | length 164.1
  Top Layer w19.68: R235.1@3464.81,10258.61 3495.43,10245.86 3521.86,10253.94 R234.2@3625.14,10253.94
$4N1565: C137.1 D20.4 R205.2 R222.2 | length 289.3
  Bottom Layer w13.78: C137.1@5022.78,9238.19 R205.2@5111.36,9238.19 R222.2@5111.36,9173.23 ; R222.2@5095.61,9173.23 R222.2@5111.36,9173.23 ; D20.4@5221.6,9196.85 5198.59,9196.85 5174.97,9173.23 R222.2@5111.36,9173.23
$4N1567: D20.1 D24.1 D24.2 R102.1 R240.2 | length 707.9
  Bottom Layer w9.84: D20.1@5296.4,9090.55 5373.1,9090.55 5420.45,9137.9 5420.45,9410.36 5413.49,9417.32 D24.1@5381.05,9417.32 ; 5369.07,9391.9 D24.2@5381.05,9379.92 ; D24.1@5369.07,9417.32 D24.1@5370.22,9417.32
  Bottom Layer w13.78: R240.2@5272.78,8996.06 5296.4,9019.68 D20.1@5296.4,9090.55 ; R102.1@5321.99,9488.19 5370.22,9439.96 5370.22,9417.32 D24.1@5381.05,9417.32 ; 5369.07,9391.9 D24.1@5369.07,9417.32
$4N1570: C105.2 D17.8 R222.1 R255.1 | length 1889.1
  Top Layer w19.68: v1(4634.98,9316.93) 4662.54,9316.93 v1(4713.72,9368.11)
  Bottom Layer w9.84: C105.2@3940.1,8992.13 3940.1,8947.16 3970.92,8916.34 4015.82,8916.34 4015.98,8916.18 4269.13,8916.18 4286.24,8899.07 4379.73,8899.07 4398.23,8917.56 4398.23,8960.49 4453.49,9015.75 4548.19,9015.75 4588.72,9056.28 4588.72,9290.38 4615.27,9316.93 v1(4634.98,9316.93)
  Bottom Layer w13.78: C105.2@3940.1,8992.13 R255.1@3999.16,8992.13 4038.53,9031.5 4038.53,9079.33 4090.69,9131.5 D17.8@4109.39,9131.5 ; v1(4713.72,9368.11) 4738.33,9368.11 4748.02,9358.42 4915.4,9358.42 4981.59,9292.23 4981.59,9218.35 5026.72,9173.23 R222.1@5028.68,9173.23
$4N1571: D21.3 R225.2 R241.1 R254.2 | length 229.6
  Bottom Layer w13.78: R241.1@3570.02,9911.42 3571.99,9911.42 3603.49,9879.92 D21.3@3603.49,9826.77 R254.2@3664.51,9826.77 R225.2@3733.41,9826.77
$4N1572: C138.1 D21.4 R206.2 R224.2 | length 342.3
  Bottom Layer w13.78: R224.2@3461.76,9547.24 C138.1@3461.76,9616.14 ; R206.2@3461.76,9685.04 C138.1@3461.76,9616.14 ; D21.4@3603.49,9720.47 3584.93,9701.92 3584.93,9668.53 3532.55,9616.14 C138.1@3461.76,9616.14
$4N1574: D14.1 D14.2 D21.1 R103.1 R241.2 | length 654.2
  Top Layer w19.68: v1(3489.31,9848.43) 3572.96,9764.78 3716.66,9764.78 v1(3774.75,9706.69)
  Bottom Layer w13.78: R241.2@3503.09,9911.42 3503.09,9862.2 v1(3489.31,9848.43) 3489.31,9843.5 3506.05,9826.77 D21.1@3528.68,9826.77 ; R103.1@3694.04,9629.92 3694.04,9631.89 3721.6,9659.45 D14.1@3755.06,9659.45 3755.06,9693.9 3767.86,9706.69 v1(3774.75,9706.69) 3777.7,9706.69 3792.46,9691.93 D14.2@3792.46,9659.45
$4N1578: C106.2 D35.7 R224.1 R256.1 | length 495.7
  Bottom Layer w13.78: D35.7@3022.78,9751.57 3022.78,9708.39 3059.91,9671.26 R256.1@3093.64,9671.26 C106.2@3172.39,9671.26 3172.39,9647.77 3190.06,9630.09 3276.77,9630.09 3359.62,9547.24 R224.1@3394.83,9547.24
$4N1579: FB18.2 R247.2 | length 254.3
  Bottom Layer w13.78: FB18.2@3304.27,9537.4 3306.24,9537.4 3332.67,9510.98 3494.38,9510.98 3530.65,9547.24 R247.2@3532.62,9547.24
$4N1580: C42.2 C93.1 D14.5 D21.5 R103.2 R247.1 | length 508.4
  Top Layer w19.68: v1(3532.62,9667.32) 3564.12,9635.83 v1(3564.12,9588.58)
  Bottom Layer w13.78: C93.1@3446.01,9753.94 3476.29,9753.94 3509.75,9720.47 D21.5@3528.68,9720.47 ; R247.1@3599.55,9547.24 3599.55,9555.12 3634.98,9590.55 C42.2@3634.98,9592.52 3644.83,9592.52 3638.92,9586.61 3662.54,9562.99 R103.2@3694.04,9562.99 3718.55,9562.99 3728.39,9553.15 D14.5@3755.06,9553.15
  Bottom Layer w19.68: D21.5@3528.68,9720.47 3528.68,9671.26 v1(3532.62,9667.32) ; v1(3564.12,9588.58) 3564.12,9580.71 3597.58,9547.24 R247.1@3599.55,9547.24
$4N1581: FB17.2 R248.2 | length 61
  Bottom Layer w13.78: FB17.2@5233.41,8907.48 R248.2@5294.43,8907.48
$4N1582: C41.2 C92.1 D20.5 D24.5 R102.2 R248.1 | length 829.2
  Top Layer w13.78: v1(5331.83,9061.02) v1(5331.83,9198.82)
  Bottom Layer w13.78: C41.2@5170.42,9442.91 5214.34,9442.91 5239.93,9417.32 D24.5@5274.75,9417.32 ; R102.2@5255.06,9488.19 5255.06,9463.54 5274.75,9443.85 D24.5@5274.75,9417.32 ; v1(5331.83,9061.02) 5331.83,9017.37 5361.36,8987.84 R248.1@5361.36,8907.48 ; v1(5331.83,9198.82) 5327.38,9198.82 5325.41,9196.85 D20.5@5296.4,9196.85 5285.15,9208.11 5285.15,9226.93 5316.09,9257.87 C92.1@5316.09,9261.81 5268.95,9308.94 5253.14,9308.94 5237.2,9324.89 5237.2,9379.5 5252.8,9395.11 5252.8,9395.38 D24.5@5274.75,9417.32
$4N1583: C38.2 C89.1 D28.10 FB13.2 R249.2 | length 620.9
  Top Layer w9.84: C38.2@4766.87,9127.95 4766.87,9129.92 4795.39,9158.44 4795.39,9165.38 v1@4789.51,9171.26
  Top Layer w19.68: C89.1@4688.13,9131.89 4730.46,9131.89 4734.39,9127.95 C38.2@4766.87,9127.95 ; v1(4788.53,9171.26) 4789.51,9171.26 D28.10@4789.51,9242.13
  Bottom Layer w13.78: v1(4788.53,9171.26) 4893.29,9171.26 4916.54,9148.02 4916.54,9038.33 4967.66,8987.2 R249.2@4967.66,8966.54 FB13.2@5038.53,8966.54
$4N1584: FB14.2 R250.2 | length 70.9
  Bottom Layer w13.78: R250.2@4967.66,8907.48 FB14.2@5038.53,8907.48
$4N1586: C37.2 C44.2 C87.1 D16.2 D17.11 R250.1 | length 1340.1
  Top Layer w13.78: v1(4164.51,9281.5) 4164.51,9160.44 4230.33,9094.62 4499.03,9094.62 v1(4603.49,8990.16)
  Top Layer w19.68: C87.1@4085.77,9281.5 v1(4164.51,9281.5)
  Bottom Layer w13.78: C37.2@4003.09,9242.13 4029.52,9268.55 4051.21,9268.55 4064.16,9281.5 D17.11@4109.39,9281.5 v1(4164.51,9281.5) ; C44.2@4544.43,8976.38 4589.71,8976.38 v1(4603.49,8990.16) 4653.68,8990.16 4678.29,8965.55 D16.2@4678.29,8933.07 4678.29,8900.59 4694.05,8884.84 4850.1,8884.84 4872.75,8907.48 R250.1@4900.73,8907.48
$4N1587: FB15.2 R252.2 | length 224.5
  Bottom Layer w13.78: R252.2@2906.64,9612.2 2906.64,9610.24 2949.23,9567.64 3068.76,9567.64 3097.58,9596.46 FB15.2@3099.55,9596.46
$4N1588: FB16.2 R251.2 | length 284.1
  Bottom Layer w13.78: R251.2@2847.58,9612.2 2847.58,9610.24 2920.42,9537.4 FB16.2@3099.55,9537.4
$4N1589: C39.2 C91.1 C94.1 D19.6 D19.8 D35.4 R252.1 | length 1722.1
  Top Layer w13.78: v1(2965.69,9899.61) 2965.69,9946.95 3049.63,10030.89 3360.96,10030.89 3406.84,10076.77 C91.1@3841.68,10076.77
  Top Layer w19.68: v1(2965.69,9899.61) 2994.24,9899.61 2996.2,9901.57 C94.1@3036.56,9901.57 ; D19.6@3836.36,10168.11 3836.36,10127.76 3841.68,10122.44 C91.1@3841.68,10076.77 3885.38,10076.77 3936.36,10127.76 D19.8@3936.36,10168.11
  Bottom Layer w13.78: R252.1@2906.64,9679.13 2906.64,9718.94 2934.08,9746.38 2934.08,9885.69 2948,9899.61 v1(2965.69,9899.61) 2967.66,9901.57 D35.4@3022.78,9901.57 3086.76,9901.57 3096.6,9891.73 C39.2@3129.08,9891.73
$4N1590: C40.2 C90.1 D35.11 R251.1 | length 472
  Top Layer w19.68: C90.1@2796.4,9901.57 2836.76,9901.57 2838.72,9899.61 v1(2867.27,9899.61)
  Bottom Layer w13.78: C40.2@2713.72,9901.57 D35.11@2810.18,9901.57 2865.3,9901.57 v1(2867.27,9899.61) 2888.15,9878.73 2888.15,9752.18 2852.65,9716.68 2852.65,9716.54 2847.58,9711.47 R251.1@2847.58,9679.13
$4N1591: C116.1 D19.1 D19.4 R234.1 | length 531.7
  Top Layer w19.68: R234.1@3625.14,10474.41 3652.7,10474.41 3698.96,10428.15 3707.82,10428.15 3752.9,10383.07 D19.4@3786.36,10383.07 3786.36,10337.8 3804.33,10319.83 3918.39,10319.83 3936.36,10337.8 D19.1@3936.36,10383.07 3973.5,10383.07 3993.97,10403.54 C116.1@4005.06,10403.54
$4N1592: C140.2 D35.5 R220.2 R221.1 V11.2 | length 547.2
  Bottom Layer w13.78: D35.5@3022.78,9851.57 3077.7,9851.57 3096.6,9832.68 R220.2@3129.08,9832.68 3129.08,9803.5 3145.68,9786.9 3227.02,9786.9 3241.28,9772.64 R221.1@3241.28,9738.19 3272.25,9738.19 3300.34,9766.27 V11.2@3300.34,9810.04 3350.41,9810.04 3388.92,9848.55 C140.2@3388.92,9874.02
$4N1594: C139.2 D17.10 R218.2 R219.1 V10.2 | length 609
  Bottom Layer w13.78: R218.2@4003.09,9183.07 4005.06,9183.07 4053.49,9231.5 D17.10@4109.39,9231.5 4150.73,9231.5 4176.32,9205.91 V10.2@4176.32,9077.76 ; C139.2@4087.74,9053.15 4150.73,9053.15 4175.34,9077.76 V10.2@4176.32,9077.76 ; R219.1@4290.5,8946.85 4176.32,9061.02 V10.2@4176.32,9077.76
$4N1596: D20.3 R223.2 R240.1 R253.2 | length 323
  Bottom Layer w13.78: R253.2@5028.68,9104.33 5055.11,9077.9 5061.02,9077.9 5093.64,9045.28 R223.2@5095.61,9045.28 5130.77,9045.28 5179.98,8996.06 R240.1@5205.85,8996.06 5205.85,9042.32 5221.6,9058.07 D20.3@5221.6,9090.55
$4N2514: D28.12 R207.2 | length 1192.2
  Top Layer w9.84: v1(4886.95,9312.99) 4889.51,9310.43 D28.12@4889.51,9242.13
  Bottom Layer w9.84: R207.2@3920.42,9501.97 3920.42,9503.94 3950.93,9534.45 4556.45,9534.45 4671.86,9419.04 4671.86,9338.19 4697.06,9312.99 v1(4886.95,9312.99)
$4N2532: D28.15 R199.1 | length 139.9
  Top Layer w19.68: D28.15@5039.51,9242.13 5039.51,9196.83 5058.34,9178 5058.34,9171.13 R199.1@5101.52,9127.95
$4N2559: D28.14 R200.1 | length 105
  Top Layer w19.68: D28.14@4989.51,9242.13 4983.59,9236.2 4983.59,9204.55 5003.09,9185.04 R200.1@5003.09,9147.64
$4N2561: D28.11 R201.1 | length 115.7
  Top Layer w19.68: R201.1@4835.77,9127.95 4835.77,9178.35 4839.51,9182.09 D28.11@4839.51,9242.13
$4N2568: C36.2 C43.2 C88.1 D16.5 D17.4 R249.1 | length 1431.4
  Top Layer w13.78: v1(4268.84,9291.34) 4227.93,9291.34 4185.35,9248.76 4185.35,9172.89 4238.89,9119.34 4510.46,9119.34 4611.48,9018.32 4635.6,9018.32 4667.08,8986.85 4716.05,8986.85 4716.68,8986.22 v1(4741.28,8986.22) 4883.01,8986.22 v1(4902.7,9005.91)
  Top Layer w19.68: v1(4268.84,9291.34) 4296.4,9291.34 4306.24,9281.5 C88.1@4345.61,9281.5
  Bottom Layer w13.78: v1(4268.84,9291.34) 4278.68,9281.5 D17.4@4321.99,9281.5 4386.95,9281.5 4426.32,9242.13 C36.2@4428.29,9242.13 ; D16.5@4715.69,9039.37 4715.69,9011.81 v1(4741.28,8986.22) 4769.18,9014.12 4780.99,9014.12 C43.2@4806.24,9039.37 ; R249.1@4900.73,8966.54 4900.73,9003.94 v1(4902.7,9005.91)